# Altium PCB PCB1.PcbDoc
Units mm, origin at the board's own origin, x right, y up, seen from the top; angles counter-clockwise.
Board outline 30 x 30 mm, 2 copper layers (Top Layer, Bottom Layer); 40 components, 28 nets, 138 pads, 14 vias.
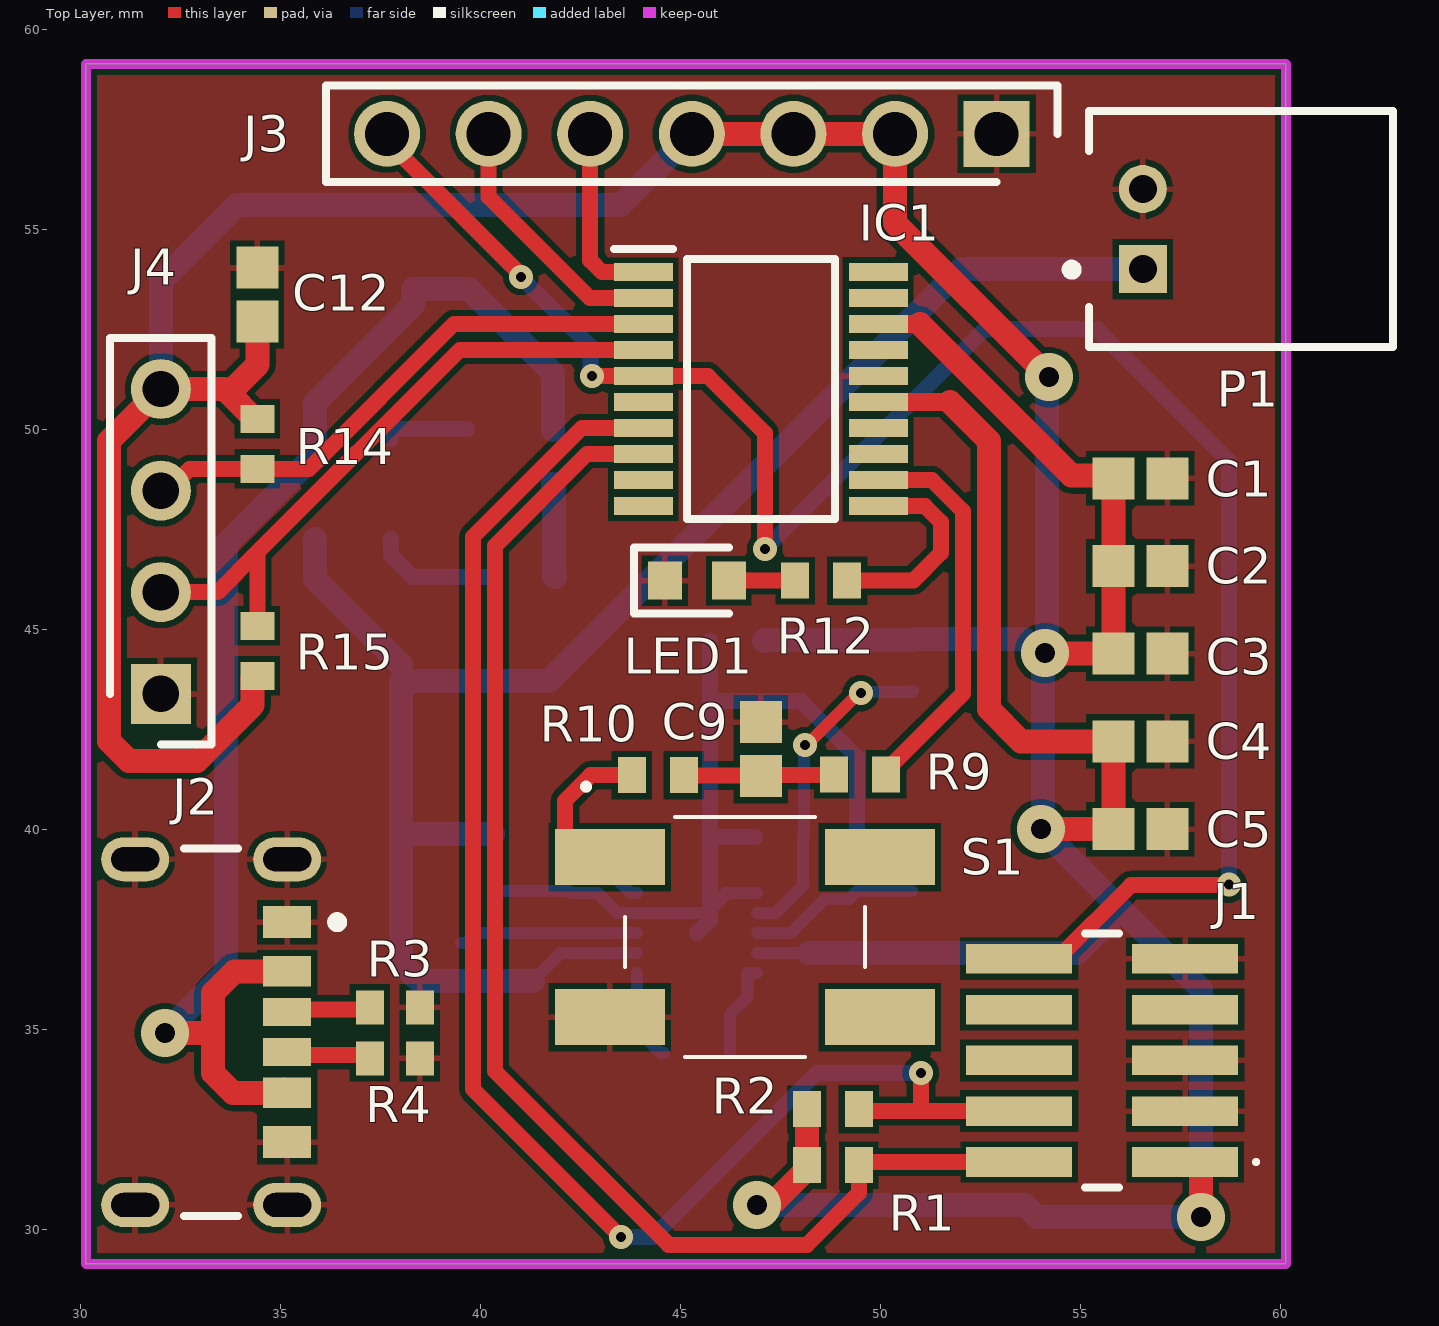
[diagram p0: Top Layer view]
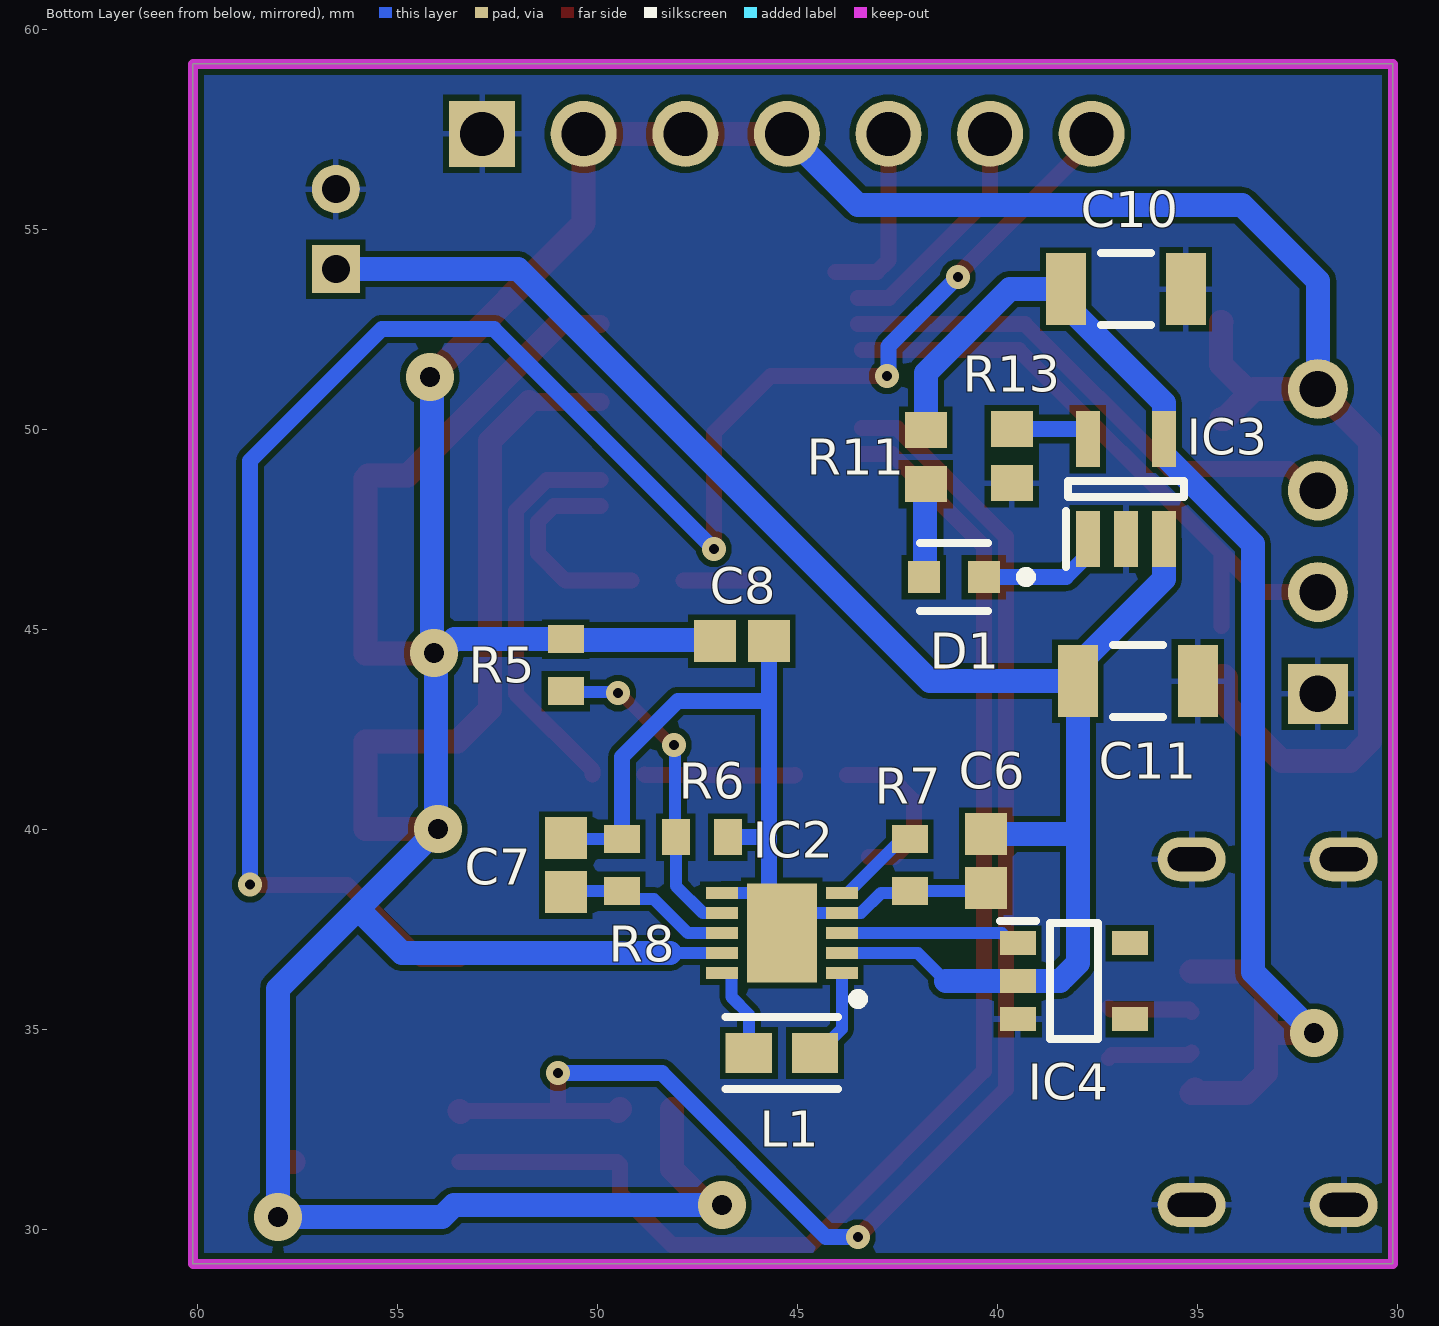
[diagram p1: Bottom Layer view, seen from below]
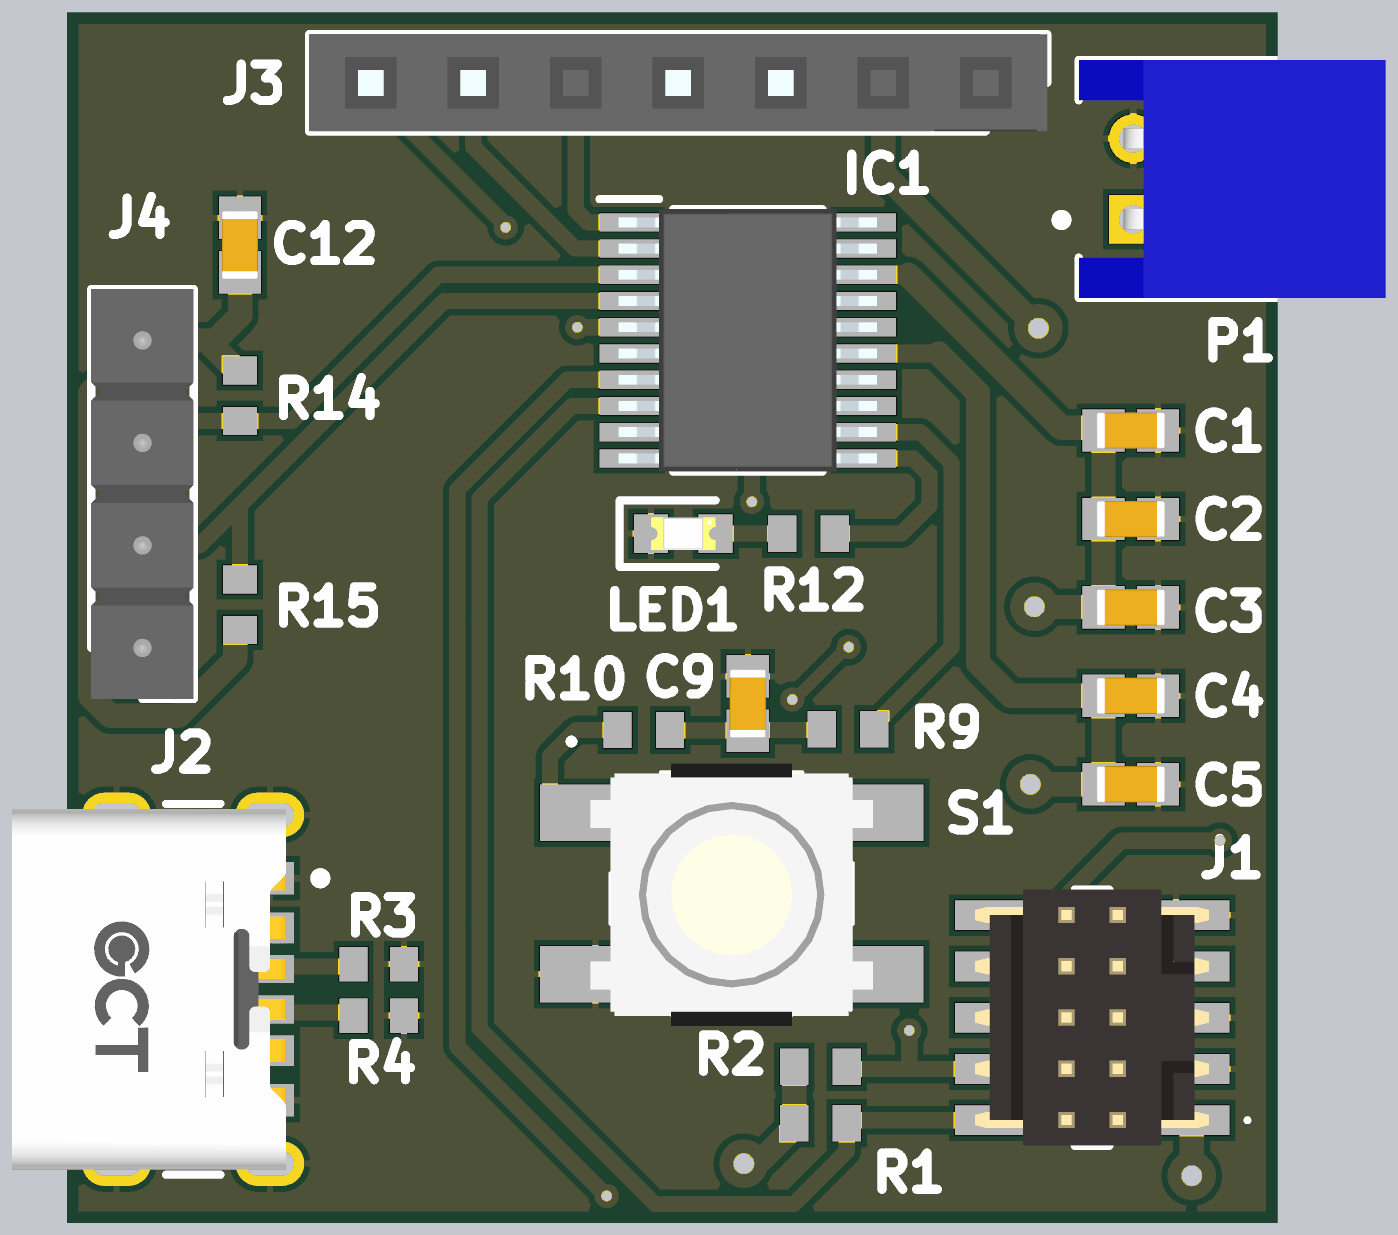
[diagram p2: 3D render of the assembled board from above, using the file's embedded part models]
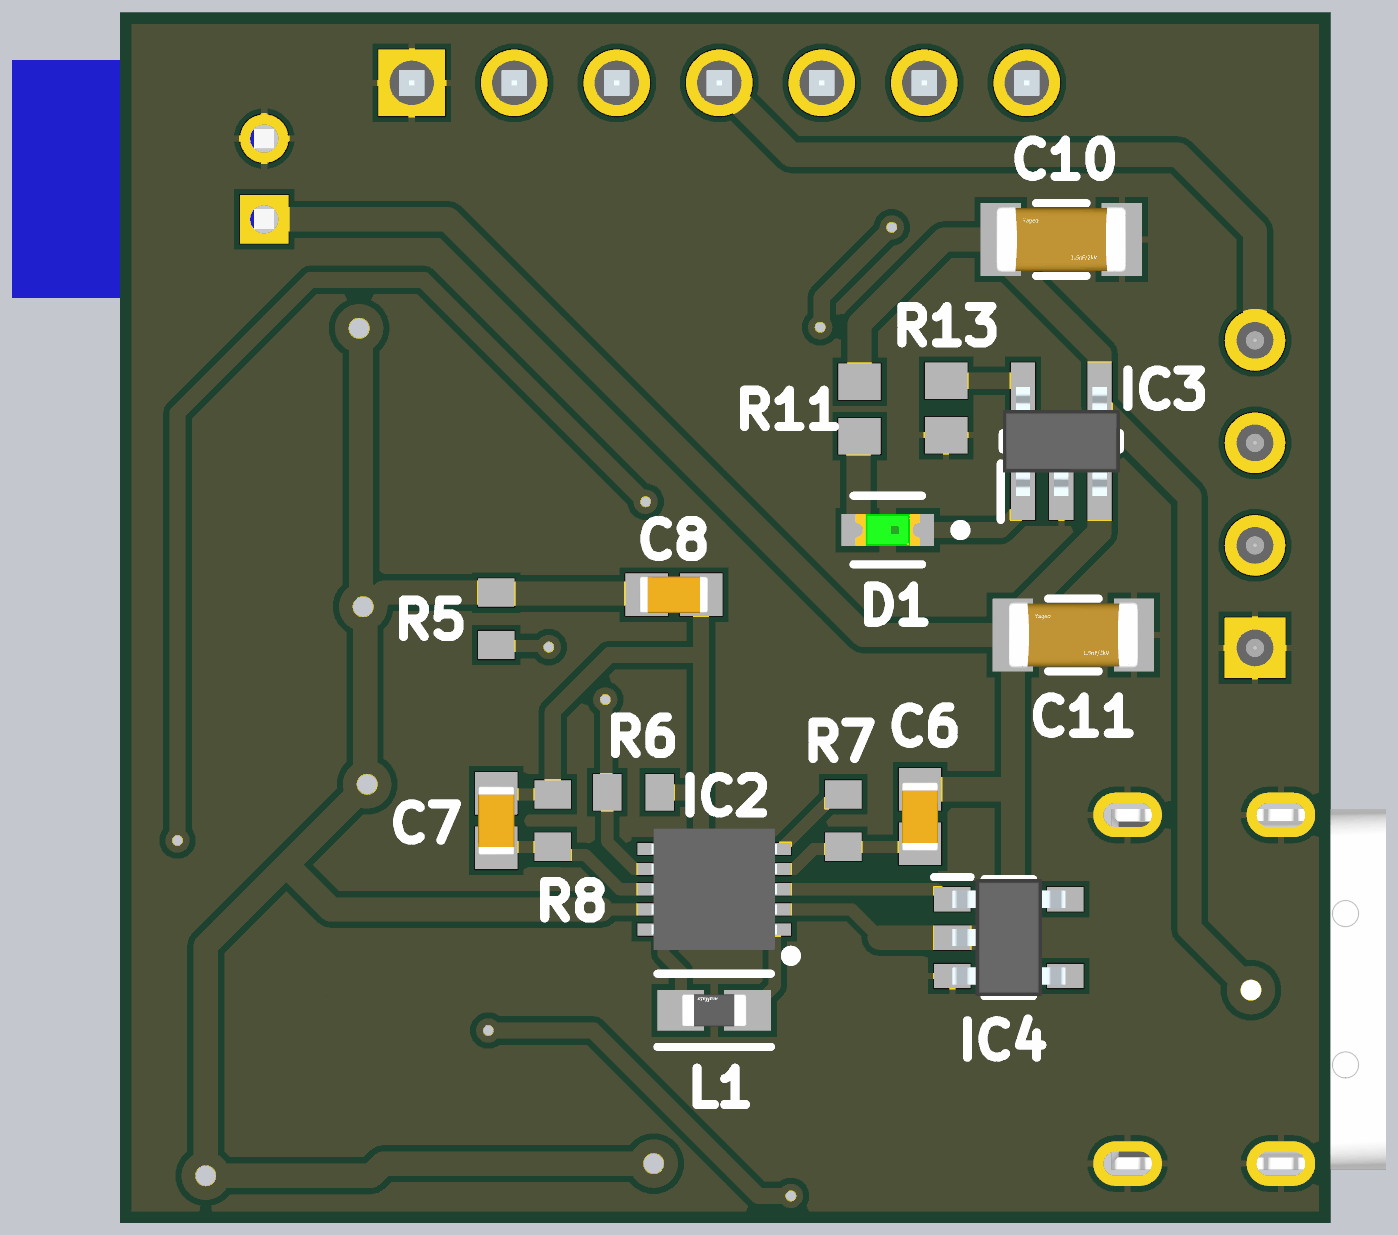
[diagram p3: 3D render of the assembled board from below, using the file's embedded part models]

## Layer stack, top to bottom
Top Solder: solder mask 0.0102, Solder Resist, Dk 3.5
Top Layer: signal copper 0.0356
Dielectric 1: dielectric 0.32, FR-4, Dk 4.8
Bottom Layer: signal copper 0.0356
Bottom Solder: solder mask 0.0102, Solder Resist, Dk 3.5

## Board outline
30.127,29.127 30.127,59.127 60.127,59.127 60.127,29.127

## Design rules (kind name [scope] priority, off if disabled: settings)
BoardOutlineClearance [All] p1: gap=0.2 ignorepadtopadclearanceinfootprint=FALSE
Clearance [All] p1: gap=0.15 ignorepadtopadclearanceinfootprint=FALSE
HoleSize [All] p1: absolutevalues=TRUE maxlimit=3.5 minlimit=0.25 maxpercent=80.000 minpercent=20.000
HoleToHoleClearance [All] p1: gap=0.25 allowstackedmicrovias=TRUE
MinimumAnnularRing [All] p1: minimumring=0.175
MinimumSolderMaskSliver [All] p1: minsoldermaskwidth=0.075
PolygonConnect [All] p1: connectstyle=Relief reliefconductorwidth=0.15 reliefentries=4 polygonreliefangle="90 Angle" airgapwidth=0.15
RoutingVias [All] p1: holewidth=0.25 width=0.6 viastyle="Through Hole" minholewidth=0.25 minwidth=0.6 maxholewidth=2 maxwidth=1.5
SilkToSilkClearance [All] p1: silktosilkclearance=0.3
SilkToSolderMaskClearance [IsPad] p1: minsilkscreentomaskgap=0.1 clearancetoexposedcopper=TRUE
SolderMaskExpansion [All] p1: expansion=0.03 istentingtop=FALSE
SupplyNets "Schematic Supply Nets_11" [InNet('VBAT')] p1: voltage=0.000
SupplyNets "Schematic Supply Nets_9" [InNet('VCC')] p2: voltage=0.000
SupplyNets "Schematic Supply Nets_8" [InNet('V3.3')] p3: voltage=0.000
SupplyNets "Schematic Supply Nets_6" [InNet('GND')] p4: voltage=0.000
UnRoutedNet [All] p1: checkbadconnections=TRUE
Width [All] p1: maxlimit=3 minlimit=0.15 preferedwidth=0.15
24 further rules are at their usual default settings.

## Components (designator, comment, footprint, x,y, rotation, side; value= is the part's Value field where it differs from the comment)
C1 "0.1uF" CAPC1608X90X40ML10T20 56.489,48.767 r180 top
C2 "0.1uF" CAPC1608X90X40ML10T20 56.489,46.575 r180 top
C3 "10uF" CAPC1608X90X40ML10T20 56.489,44.383 r180 top
C4 "0.1uF" CAPC1608X90X40ML10T20 56.489,42.192 r180 top
C5 "10uF" CAPC1608X90X40ML10T20 56.489,40 r180 top
C6 "10uF" CAPC1608X90X40ML10T20 40.3,39.2 r90 bottom
C7 "100pF" CAPC1608X90X40ML10T20 50.8,39.1 r270 bottom
C8 "10uF" CAPC1608X90X40ML10T20 46.4,44.7 r0 bottom
C9 "0.1uF" CAPC1608X90X40ML10T20 47,42 r270 top
C10 "4.7uF" FP-CC1206-1_25-MFG 36.8,53.5 r180 bottom value="4.7 uF"
C11 "4.7uF" FP-CC1206-1_25-MFG 36.5,43.7 r180 bottom value="4.7 uF"
C12 "0.1uF" CAPC1608X90X40ML10T20 34.415,53.362 r90 top
D1 "LTST-C190GKT" FP-LTST-C190GKT-MFG 41.1,46.3 r0 bottom
IC1 "LPC804M101JDH20J" SOP65P640X110-20N 47,51 r0 top
IC2 "LTC3127EDD#PBF" SON50P300X300X80-11N-D 45.4,37.4 r0 bottom
IC3 "MCP73831T-2ACI_OT" SOT95P270X145-5N 36.8,48.5 r90 bottom
IC4 "BD5330G-2MTR" SOT95P280X125-5N 38.1,36.2 r180 bottom
J1 "BD125-10-A-0305-0580-L-B" BD12510A03050580LB 55.53,34.216 r90 top
J2 "USB4125-GF-A-0190" FP-USB4125-GF-A-0190-MFG 32.157,34.921 r270 top
J3 "SSQ-107-01-T-S" RHDR7W64P254_1X7_1829X241X851P 52.895,57.381 r0 top
J4 "350-10-104-00-006000" HDRV4W46P0X254_1X4_1016X254X640P 32,43.38 r90 top
L1 "4.7uH" FP-LQM18FN_00-IPC_A 45.4,34.4 r0 bottom
LED1 "HSMR-C191-S0000" LEDC1608X70N 45.4,46.212 r0 top
P1 "S2B-PH-K-S(LF)(SN)" JST-S2B-PH-K-S_V 59,55 r90 top
R1 "100kO" RESC1608X55X30LL20T10 48.8,31.6 r180 top
R2 "100kO" RESC1608X55X30LL20T10 48.8,33 r180 top
R3 "5.1kΩ" RESC1608X55X30LL15T15 37.854,35.542 r0 top
R4 "5.1kΩ" RESC1608X55X30LL15T15 37.854,34.268 r0 top
R5 "330kO" RESC1608X55X30LL20T10 50.8,44.1 r90 bottom
R6 "180kO" RESC1608X55X30LL20T10 47.4,39.8 r0 bottom
R7 "33kO" RESC1608X55X30LL20T10 42.2,39.1 r90 bottom
R8 "510kO" RESC1608X55X30LL20T10 49.4,39.1 r270 bottom
R9 "1kO" RESC1608X55X30LL20T10 49.48,41.367 r0 top
R10 "0.1kO" RESC1608X55X30LL20T10 44.423,41.346 r0 top
R11 "470Ohm" RESC1609X50X30ML10T20 41.8,49.3 r90 bottom
R12 "1kO" RESC1608X55X30LL20T10 48.505,46.212 r0 top
R13 "2kOhm" RESC1609X50X30ML10T20 39.654,49.325 r90 bottom
R14 "10kΩ" RESC1608X55X30LL15T15 34.415,49.63 r90 top
R15 "10kΩ" RESC1608X55X30LL15T15 34.415,44.451 r270 top
S1 "B3SN-3012P" B3SN3012P 46.599,37.294 r180 top

## Footprints (in the part's own frame and the unit in brackets; to place one, negate y for a bottom-side part, rotate by r counter-clockwise, add the part's x,y. Pads: shape width x height; smd on the part's side, far side on the other; paste and mask are expansions set on the pad)
B3SN3012P [mm]
  rect 2.75x1.4 smd: 1(3.375,-2) 2(-3.375,-2) 3(3.375,2) 4(-3.375,2)
  silkscreen extent -3,-3.82 4.02,3, body extent -3.5,-3.22 3.5,3.28, height 3.1
BD12510A03050580LB [mm]
  rect 0.74x2.65 smd: 1(-2.54,-2.075) 2(-2.54,2.075) 3(-1.27,-2.075) 4(-1.27,2.075) 5(0,-2.075) 6(0,2.075) 7(1.27,-2.075) 8(1.27,2.075) 9(2.54,-2.075) 10(2.54,2.075)
  silkscreen extent -3.17,-3.9 3.18,0.43, body extent -3.17,-2.9 3.18,2.9, height 6.12
CAPC1608X90X40ML10T20 [mm] "Chip Capacitor, 2-Leads, Body 1.7x0.9mm, IPC Low Density"
  rect 1.05x1.05 smd: 1(-0.675,0) 2(0.675,0)
  body extent -0.85,-0.45 0.85,0.45, height 0.9
FP-CC1206-1_25-MFG [mm]
  rect 1x1.8 smd paste+0 mask+0: 1(-1.5,0) 2(1.5,0)
  silkscreen extent -0.62,-0.9 0.62,0.9, body extent -1.6,-0.8 1.6,0.8, height 1.45
FP-LQM18FN_00-IPC_A [mm]
  rect 1.158x1.012 smd paste+0 mask+0: 1(-0.827,0) 2(0.827,0)
  silkscreen extent -1.41,-0.91 1.41,0.91, body extent -0.8,-0.4 0.8,0.4, height 0.9
FP-LTST-C190GKT-MFG [mm]
  rect 0.8x0.8 smd paste+0 mask+0: 1(-0.75,0) 2(0.75,0)
  silkscreen extent -1.92,-0.85 0.85,0.85, body extent -0.8,-0.4 0.8,0.4, height 0.9
FP-USB4125-GF-A-0190-MFG [mm]
  rrect100% 1.1x1.7 hole 1.2 slot 0.6 at 0 deg paste-2539.97 mask+0: 1(-4.32,3) 2(4.32,3) 3(-4.32,-0.8) 4(4.32,-0.8)
  rect 0.7x1.2 smd paste+0 mask+0: A5(-0.5,3) B5(0.5,3)
  rect 0.76x1.2 smd paste+0 mask+0: A9(1.52,3) B9(-1.52,3)
  rect 0.8x1.2 smd paste+0 mask+0: A12(2.75,3) B12(-2.75,3)
  silkscreen extent -4.59,0.43 4.59,4.38, body extent -4.97,-3.57 4.97,3.95, height 0.25
HDRV4W46P0X254_1X4_1016X254X640P [mm]
  rect 1.5x1.5 hole 0.91: 1(0,0)
  round 1.5 hole 0.91: 2(2.54,0) 3(5.08,0) 4(7.62,0)
  silkscreen extent -1.27,-1.27 8.89,1.27, body extent -1.27,-1.27 8.89,1.27, height 6.4
JST-S2B-PH-K-S_V [mm] "THD, 2-Leads, Body 7.6x5.9mm, Pitch 2mm"
  rect 1.2x1.2 hole 0.7: 1(-1,2.45)
  round 1.2 hole 0.7: 2(1,2.45)
  silkscreen extent -2.95,-3.8 2.95,4.35, body extent -2.95,-3.8 2.95,3.8, height 4.8
LEDC1608X70N [mm]
  rect 0.85x0.95 smd: 1(-0.8,0) 2(0.8,0)
  silkscreen extent -1.57,-0.82 0.8,0.83, body extent -0.8,-0.4 0.8,0.4, height 0.6
RESC1608X55X30LL15T15 [mm] "Chip Resistor, 2-Leads, Body 1.60x0.80mm, IPC High Density"
  rect 0.7x0.85 smd: 1(-0.625,0) 2(0.625,0)
  body extent -0.87,-0.48 0.87,0.48, height 0.55
RESC1608X55X30LL20T10 [mm] "Chip Resistor, 2-Leads, Body 1.60x0.80mm, IPC High Density"
  rect 0.7x0.9 smd: 1(-0.65,0) 2(0.65,0)
  body extent -0.9,-0.5 0.9,0.5, height 0.55
RESC1609X50X30ML10T20 [mm] "Chip Resistor, 2-Leads, Body 1.55x0.85mm, IPC Low Density"
  rect 0.9x1.05 smd: 1(-0.675,0) 2(0.675,0)
  body extent -0.82,-0.48 0.82,0.48, height 0.5
RHDR7W64P254_1X7_1829X241X851P [mm]
  rect 1.65x1.65 hole 1.1: 1(0,0)
  round 1.65 hole 1.1: 2(-2.54,0) 3(-5.08,0) 4(-7.62,0) 5(-10.16,0) 6(-12.7,0) 7(-15.24,0)
  silkscreen extent -16.77,-1.2 1.53,1.21, body extent -16.77,-1.2 1.53,1.2, height 8.51
SON50P300X300X80-11N-D [mm]
  rect 0.8x0.3 smd: 1(-1.5,1) 2(-1.5,0.5) 3(-1.5,0) 4(-1.5,-0.5) 5(-1.5,-1) 6(1.5,-1) 7(1.5,-0.5) 8(1.5,0) 9(1.5,0.5) 10(1.5,1)
  rect 1.75x2.48 smd: 11(0,0)
  silkscreen extent -2.02,1.53 -1.77,1.77, body extent -1.55,-1.5 1.55,1.5, height 0.8
SOP65P640X110-20N [mm]
  rect 1.475x0.45 smd: 1(-2.938,2.925) 2(-2.938,2.275) 3(-2.938,1.625) 4(-2.938,0.975) 5(-2.938,0.325) 6(-2.938,-0.325) 7(-2.938,-0.975) 8(-2.938,-1.625) 9(-2.938,-2.275) 10(-2.938,-2.925) 11(2.938,-2.925) 12(2.938,-2.275) 13(2.938,-1.625) 14(2.938,-0.975) 15(2.938,-0.325) 16(2.938,0.325) 17(2.938,0.975) 18(2.938,1.625) 19(2.938,2.275) 20(2.938,2.925)
  silkscreen extent -3.68,-3.25 1.85,3.5, body extent -3.2,-3.25 3.2,3.25, height 1.1
SOT95P270X145-5N [mm]
  rect 1.4x0.6 smd: 1(-1.25,0.95) 2(-1.25,0) 3(-1.25,-0.95) 4(1.25,-0.95) 5(1.25,0.95)
  silkscreen extent -1.95,-1.45 0.2,1.5, body extent -1.35,-1.45 1.35,1.45, height 1.45
SOT95P280X125-5N [mm]
  rect 0.9x0.6 smd: 1(-1.4,0.95) 2(-1.4,0) 3(-1.4,-0.95) 4(1.4,-0.95) 5(1.4,0.95)
  silkscreen extent -1.85,-1.45 0.6,1.5, body extent -1.4,-1.45 1.4,1.45, height 1.25

## Part data
C1 C2 C3 C4 C5 C6 C8 C9 C12: library part CMP-2100-03594-1, "Chip Capacitor, 100 pF, +/- 5%, 50 V, -55 to 125 degC, 0603 (1608 Metric), RoHS, Tape and Reel", Capacitance=100pF, Case Code (Imperial)=0603, Case Code (Metric)=1608, Dielectric=C0G, Insulation Resistance=100GR, Manufacturer=Yageo, Max Operating Temperature=125degC, Min Operating Temperature=-55degC, Package Description="2-Pin Surface Mount Device, Body 1.6 x 0.8 mm", Package Quantity=1, Temperature Coefficient=30ppm/degC, Tolerance=5%, Voltage=50V, Case/Package=0603, Composition=Ceramic, Datasheet URL=http://www.yageo.com/documents/recent/UPY-GP_NP0_16V-to-50V_14.pdf, Datasheet Version="Rev. 14, 07/2016", Depth=0.8mm, Height=0.8mm, Lead Free=LeadFree, Length=1.6mm, Manufacturer URL=http://www.yageo.com/, Mount=SurfaceMount, Number of Pins=2, Package Reference=0603, Packaging=TapeandReel, Radiation Hardening=No, REACH SVHC=Unknown, RoHSCompliant=True, Termination=SMD/SMT, Thickness=0.035inch, Voltage Rating=50V, Voltage Rating (DC)=50V, Width=0.8mm
C7: library part CMP-2100-03594-1, "Chip Capacitor, 100 pF, +/- 5%, 50 V, -55 to 125 degC, 0603 (1608 Metric), RoHS, Tape and Reel", Case Code (Imperial)=0603, Case Code (Metric)=1608, Dielectric=C0G, Insulation Resistance=100GR, Manufacturer=Yageo, Max Operating Temperature=125degC, Min Operating Temperature=-55degC, Package Description="2-Pin Surface Mount Device, Body 1.6 x 0.8 mm", Package Quantity=1, Temperature Coefficient=30ppm/degC, Tolerance=5%, Voltage=50V, Capacitance=100pF, Case/Package=0603, Composition=Ceramic, Datasheet URL=http://www.yageo.com/documents/recent/UPY-GP_NP0_16V-to-50V_14.pdf, Datasheet Version="Rev. 14, 07/2016", Depth=0.8mm, Height=0.8mm, Lead Free=LeadFree, Length=1.6mm, Manufacturer URL=http://www.yageo.com/, Mount=SurfaceMount, Number of Pins=2, Package Reference=0603, Packaging=TapeandReel, Radiation Hardening=No, REACH SVHC=Unknown, RoHSCompliant=True, Termination=SMD/SMT, Thickness=0.035inch, Voltage Rating=50V, Voltage Rating (DC)=50V, Width=0.8mm
C10 C11: library part CMP-03422-000173-1, "CAP CER 4.7UF 50V X7R 1206", Capacitance="4.7 uF", Manufacturer=Yageo, Manufacturer Part Number=CC1206KKX7R9BB475, Package=CC1206-1.25, Temperature="-55°C to +125°C", Temperature Characteristic=X7R, Temperature Coefficient=15%, Temperature Range High=+125°C, Temperature Range Low=-55°C, Tolerance=0.1, Voltage Rating="50 V", Automotive=No, Automotive Grade=NA, Category=Cap, ComponentLink2Description=Datasheet, ComponentLink2URL=http://www.yageo.com/documents/recent/UPY-NP0X7R_HV_1KV-to-3KV_11.pdf, Device Class L1="Passive Components", Device Class L2=Capacitors, Device Class L3="Ceramic Capacitors", Digikey Description="CAP CER 4.7UF 50V X7R 1206", Footprint Url=http://www.yageo.com/exep/pages/download/literatures/UPY-C_GEN_24.pdf, Height=1.45mm, Lead Free=Yes, Material=Ceramic, Mouser Description="CC Series 1206 4.7 uF 50 V ±10% Tolerance X7R Multilayer Ceramic Capacitor", Octopart=https://octopart.com/cc1206kkx7r9bb475-yageo-50417574, RoHS=TRUE
D1: library part CMP-22017-000005-2, "LED GREEN CLEAR CHIP SMD", Case Code (Imperial)=0603, Case Code (Metric)=1608, Color=Green, Forward Current=30mA, Forward Voltage=2.1V, Lens Color=Colorless, Max Operating Temperature=85°C, Min Operating Temperature=-55°C, Package Quantity=1, Power Dissipation=100mW, Reverse Voltage=5V, Test Current=10mA, Voltage=2V, Case/Package=0603, Depth=0.8mm, Dominant Wavelength=569nm, Height=0.8mm, Illumination Color=Green, Lead Free="Lead Free", Length=1.6mm, Lens Style=Clear, Lens Transparency=Clear, Luminous Intensity=6mcd, Mount="Surface Mount", Number of Elements=1, Number of LEDs=1, Number of Pins=2, Packaging="Tape and Reel", Power Rating=100mW, Radiation Hardening=No, Viewing Angle=130°, Wavelength=565nm, Width=0.8mm
IC1: "Integrated Circuit", Manufacturer_Name=NXP, Mouser Part Number=771-LPC804M101JDH20J, Datasheet Link=https://www.nxp.com/docs/en/nxp/data-sheets/LPC804_DS.pdf, Height=1.1mm, Manufacturer_Part_Number=LPC804M101JDH20J, Mouser Price/Stock=https://www.mouser.co.uk/ProductDetail/NXP-Semiconductors/LPC804M101JDH20J?qs=W0yvOO0ixfFx8%2FU1a3Isyw%3D%3D
IC2: "Integrated Circuit", Manufacturer_Name="Analog Devices", Mouser Part Number=584-LTC3127EDD#PBF, Arrow Part Number=LTC3127EDD#PBF, Arrow Price/Stock=https://www.arrow.com/en/products/ltc3127eddpbf/analog-devices, Datasheet Link=https://www.analog.com/media/en/technical-documentation/data-sheets/3127fa.pdf, Height=0.8mm, Manufacturer_Part_Number=LTC3127EDD#PBF, Mouser Price/Stock=https://www.mouser.co.uk/ProductDetail/Analog-Devices/LTC3127EDDPBF?qs=hVkxg5c3xu8G1q1ZX405dA%3D%3D
IC3: "Integrated Circuit", Arrow Part Number=MCP73831T-2ACI/OT, Manufacturer_Name=Microchip, Mouser Part Number=579-MCP73831T-2ACIOT, Arrow Price/Stock=https://www.arrow.com/en/products/mcp73831t-2aciot/microchip-technology?utm_currency=USD&region=nac, Datasheet Link=http://ww1.microchip.com/downloads/en/DeviceDoc/20001984g.pdf, Height=1.45mm, Manufacturer_Part_Number=MCP73831T-2ACI/OT, Mouser Price/Stock=https://www.mouser.co.uk/ProductDetail/Microchip-Technology/MCP73831T-2ACI-OT?qs=yUQqVecv4qvbBQBGbHx0Mw%3D%3D
IC4: "Integrated Circuit", Manufacturer_Name="ROHM Semiconductor", Mouser Part Number=755-BD5330G-2MTR, Datasheet Link=https://fscdn.rohm.com/en/products/databook/datasheet/ic/power/voltage_detector/bd5xxxg-2m-e.pdf, Height=1.25mm, Manufacturer_Part_Number=BD5330G-2MTR, Mouser Price/Stock=https://www.mouser.co.uk/ProductDetail/ROHM-Semiconductor/BD5330G-2MTR?qs=YCa%2FAAYMW01zqS1e%252B79Sag%3D%3D
J1: "Connector", Manufacturer_Name="GCT (GLOBAL CONNECTOR TECHNOLOGY)", Mouser Part Number=640-BD12510A305580LB, Datasheet Link=https://gct.co/connector/bd125, Height=6.37mm, Manufacturer_Part_Number=BD125-10-A-0305-0580-L-B, Mouser Price/Stock=https://www.mouser.co.uk/ProductDetail/GCT/BD125-10-A-0305-0580-L-B?qs=amGC7iS6iy%252BPUE%252B5wV8wFA%3D%3D
J2: library part CMP-245163-000004-1, "CONN RCPT TYPE C 6P SMD RA"
J3: "Connector", Manufacturer_Name=SAMTEC, Mouser Part Number=200-SSQ10701TS, Datasheet Link=http://suddendocs.samtec.com/prints/ssq-1xx-xx-xxx-x-xx-xxx-xx-x-mkt.pdf, Height=8.51mm, Manufacturer_Part_Number=SSQ-107-01-T-S, Mouser Price/Stock=https://www.mouser.co.uk/ProductDetail/Samtec/SSQ-107-01-T-S?qs=rU5fayqh%252BE1xq4UrLxRC5Q%3D%3D
J4: "Connector", Manufacturer_Name=Mill-Max, Datasheet Link=https://www.mouser.com/datasheet/2/273/MMMCS22968_1-2552356.pdf, Height=6.401mm, Manufacturer_Part_Number=350-10-104-00-006000
L1: library part CMP-06042-016387-1, "FIXED IND 4.7UH 80MA 600 MOHM", Case Code (Imperial)=0603, Case Code (Metric)=1608, Current Rating=80mA, DC Resistance (DCR)=600mR, Max Operating Temperature=125°C, Min Operating Temperature=-55°C, Package Quantity=4000, Self Resonant Frequency=50MHz, Test Frequency=1MHz, Tolerance=20%, Case/Package=0603, Core Material=Ferrite, DC Current=80mA, Depth=0.9mm, Height=0.8mm, Height - Seated (Max)=0.035inch, Inductance=4.7uH, Lead Free="Lead Free", Length=1.6mm, Max DC Current=80mA, Military Standard=Not, Mount="Surface Mount", Packaging="Tape and Reel", Radiation Hardening=No, Rated Current-Max=80mA, RoHS Compliant=Yes, Saturation Current=80mA, Series=LQM18F, Shielding=Shielded, Termination=SMD/SMT, Weight=7.1E-05oz, Width=0.031inch
LED1: "LED", Manufacturer_Name="Avago Technologies", Mouser Part Number=630-HSMR-C191-S0000, Datasheet Link=https://docs.broadcom.com/docs/HSMR-C191-S0000-DS100, Height=0.7mm, Manufacturer_Part_Number=HSMR-C191-S0000, Mouser Price/Stock=https://www.mouser.co.uk/ProductDetail/Broadcom-Avago/HSMR-C191-S0000?qs=tMOYG%252Bw4%252BLxppTo9IXYduQ%3D%3D
P1: library part CMP-1755-00004-1, "Male Header, Pitch 2 mm, 1 x 2 Position, Height 4.8 mm, Tail Length 3.4 mm, -25 to 85 degC, RoHS, Bulk", Capacitance="10 uF", Case\Package=Radial, Max Operating Temperature="85 degC", Min Operating Temperature="-40 degC", Package Quantity=200, Tolerance=20%, Voltage Rating="50 V", ComponentLink1Description=Datasheet, ComponentLink1URL=http://www.jst-mfg.com/product/pdf/eng/ePH.pdf, DatasheetVersion=Dec-12, Diameter="5 mm", Height="11 mm", Lead Pitch="2 mm", Length="11 mm", Mount="Through Hole", PackageDescription="Male Header, Pitch 2 mm, 1 x 2 Position, Height 4.8 mm, Tail Length 3.4 mm", PackageReference=S2B-PH-K-S, Packaging=Bulk, Pins=2, Radiation Hardening=No, REACH SVHC="No SVHC", RoHSCompliant=true, Voltage Rating (DC)="50 V"
R1 R2 R5 R6 R7 R8 R9 R10 R12: library part CMP-2000-01250-1, Manufacturer="KOA Speer", Part Number=RK73H1JTTD1823F
R3 R4 R14 R15: library part CMP-2000-00803-1, Manufacturer=Panasonic, Part Number=ERJ-3GEYJ512V
R11 R13: library part CMP-2000-03159-1, Manufacturer="Vishay Dale", Part Number=CRCW06032K00FKEA
S1: "Switch", Manufacturer_Name="Omron Electronics", Mouser Part Number=653-B3SN-3012P, Arrow Part Number=B3SN-3012P, Arrow Price/Stock=https://www.arrow.com/en/products/b3sn3012p/omron?region=nac, Datasheet Link=https://componentsearchengine.com/Datasheets/2/B3SN-3012P.pdf, Height=3.4mm, Manufacturer_Part_Number=B3SN-3012P, Mouser Price/Stock=https://www.mouser.co.uk/ProductDetail/Omron-Electronics/B3SN-3012P?qs=nNiD76Ca0%252BuGaCx%252BnRL5KQ%3D%3D

## Via types
v1: diameter 0.6, hole 0.25, Top Layer to Bottom Layer, tented both sides, 8 vias
v2: diameter 1.2, hole 0.5, Top Layer to Bottom Layer, tented both sides, 6 vias

## Nets (pads, with @x,y where several pads share a name; then routed paths per layer and width w, separated by ;. In a path a pad name is that pad's centre, name@x,y a point inside that pad or via, vN(x,y) a via of type N, cw(c..) or ccw(c..) an arc to the next point about the centre after c; other vN are vias at no path point)
EN: IC2.3 IC4.1 | length 4.5
  Bottom Layer w0.3: IC4.1 39.65,37.15 39.9,37.4 IC2.3
GND: C1.1 C2.1 C3.1 C4.1 C5.1 C9.1 C10.2 C11.2 C12.2 IC1.16 IC3.2 IC4.3 J1.3 J1.5 J1.9 J2.1 J2.2 J2.3 J2.4 J2.A12 J2.B12 J3.1 J4.1 LED1.1 P1.2 R3.2 R4.2 R13.1 S1.3
GPIO_BTN: IC1.12 R9.2 | length 9.8
  Top Layer w0.4: IC1.12 51.275,48.725 52.05,47.95 52.05,43.387 50.13,41.467 R9.2
GPIO_LED: IC1.11 R12.2 | length 5.1
  Top Layer w0.4: R12.2 50.812,46.212 51.5,46.9 51.5,47.675 51.1,48.075 IC1.11
I2C0_SCL: IC1.1 J3.5 | length 4.6
  Top Layer w0.4: J3.5 42.735,54.218 43.028,53.925 IC1.1
I2C0_SDA: IC1.2 J3.6 | length 5.9
  Top Layer w0.381: 40.195,55.805 40.2,55.8
  Top Layer w0.4: 40.195,55.805 J3.6 ; 40.2,55.8 42.725,53.275 IC1.2@43.5,53.275
I2C1_SCL: IC1.3 J4.3 R14.1 | length 13.2
  Top Layer w0.4: J4.3 32.176,48.46 32.72,49.005 R14.1 35.705,49.005 39.325,52.625 IC1.3@43.5,52.625
I2C1_SDA: IC1.4 J4.2 R15.1 | length 15.7
  Top Layer w0.4: J4.2 33.42,45.92 34.415,46.915 ; R15.1 34.415,46.915 ; IC1.4@43.4,51.975 39.475,51.975 34.415,46.915
NetC6_1: C6.1 C7.1 C8.1 IC2.4 IC2.6 IC2.11 R6.1 R7.1 R8.1 | length 23.9
  Bottom Layer w0.3: C6.1 40.375,38.45 R7.1 42.249,38.401 42.924,38.401 43.426,37.9 45.675,37.9 45.725,37.95 IC2.11@46.15,38.375 ; IC2.11@45.725,38 46.125,38.4 IC2.6 ; R8.1 C7.1@50.775,39.75
  Bottom Layer w0.4: IC2.11 45.725,37.725 45.725,37.95 45.725,38 45.725,39.9 ; C8.1 45.725,43.2 ; R6.1@46.85,39.8 R6.1 45.825,39.8 45.725,39.9 ; R8.1 49.4,41.8 48,43.2 45.725,43.2 ; 45.725,39.9 45.725,43.2
NetC7_2: C7.2 IC2.8 R8.2 | length 4.3
  Bottom Layer w0.3: IC2.8 47.75,37.4 48.6,38.25 49.2,38.25 R8.2 C7.2@50.775,38.45
NetC9_2: C9.2 R9.1 R10.2 | length 3.8
  Top Layer w0.4: R10.2 45.084,41.336 46.989,41.336 C9.2 47.021,41.346 48.809,41.346 R9.1
NetD1_1: D1.1 IC3.1 | length 3.2
  Bottom Layer w0.4: IC3.1 37.75,46.85 38.3,46.3 D1.1
NetD1_2: D1.2 R11.1 | length 2.3
  Bottom Layer w0.6: R11.1 41.825,48.6 41.825,46.325 D1.2
NetIC2_1: IC2.1 L1.1 | length 2.3
  Bottom Layer w0.3: IC2.1 43.9,35 44.5,34.4 L1.1
NetIC2_5: IC2.5 R7.2 | length 2.3
  Bottom Layer w0.3: R7.2@42.35,39.6 42.55,39.6 43.75,38.4 IC2.5
  Bottom Layer w0.4: R7.2 R7.2@42.35,39.6
NetIC2_7: IC2.7 R5.1 R6.2 | length 8.2
  Top Layer w0.3: v1(48.1,42.1) 48.15,42.1 49.45,43.4 v1(49.5,43.4)
  Bottom Layer w0.3: IC2.7 47.374,37.9 48.05,38.576 R6.2 48.075,39.825 48.075,42.075 v1(48.1,42.1) ; v1(49.5,43.4) 49.525,43.425 50.775,43.425 R5.1
NetIC2_10: IC2.10 L1.2 | length 2.4
  Bottom Layer w0.3: L1.2 46.227,35.367 46.66,35.8 46.66,36.4 IC2.10
NetIC3_5: IC3.5 R13.2 | length 2.1
  Bottom Layer w0.4: IC3.5 37.75,49.9 37.85,50 R13.2
NetJ2_A5: J2.A5 R3.1 | length 2.1
  Top Layer w0.381: J2.A5 J2.A5@35.218,35.482 ; R3.1@37.169,35.482 R3.1
  Top Layer w0.4: J2.A5@35.218,35.482 R3.1@37.169,35.482
NetJ2_B5: J2.B5 R4.1 | length 2.1
  Top Layer w0.381: J2.B5 J2.B5@35.234,34.345 ; R4.1@37.152,34.345 R4.1
  Top Layer w0.4: J2.B5@35.234,34.345 R4.1@37.152,34.345
NetLED1_2: LED1.2 R12.1 | length 1.7
  Top Layer w0.4: LED1.2 R12.1
NetR10_1: R10.1 S1.1 | length 4.2
  Top Layer w0.4: S1.1 42.6,39.294 42.1,39.794 42.1,40.7 42.746,41.346 R10.1
RESETN: IC1.5 J1.10 J3.7 | length 47.7
  Top Layer w0.4: J3.7 37.655,57.199 41,53.854 v1(41,53.8) ; v1(42.775,51.325) IC1.5@44.012,51.325 ; IC1.5 45.675,51.325 47.1,49.9 v1@47.1,47.092 ; J1.10 54.41,36.756 56.255,38.6 v1@58.7,38.6
  Bottom Layer w0.4: v1(41,53.8) 42.737,52.063 42.737,51.363 v1(42.775,51.325) ; v1(47.1,47) 52.6,52.5 55.4,52.5 58.7,49.2 v1(58.7,38.608)
SWCLK: IC1.7 J1.4 R2.1 | length 38
  Top Layer w0.4: IC1.7@43.4,50.025 42.525,50.025 39.8,47.3 39.8,33.5 v1(43.5,29.8) ; R2.1@49.5,32.946 51,32.946 ; v1(51,33.9) 51,32.946 ; J1.4 51,32.946
  Top Layer w0.6: R2.1 49.45,32.996 R2.1@49.5,32.946 ; J1.4@53.432,32.923 J1.4
  Bottom Layer w0.4: v1(43.5,29.8) 44.3,29.8 48.4,33.9 v1(51,33.9)
SWDIO: IC1.8 J1.2 R1.1 | length 33.3
  Top Layer w0.4: IC1.8@43.4,49.375 42.653,49.375 40.35,47.072 40.35,33.95 44.696,29.604 48.154,29.604 49.45,30.9 R1.1 49.526,31.676 J1.2
V3.3: C1.2 C2.2 C3.2 C4.2 C5.2 C8.2 C12.1 IC1.15 IC1.18 IC2.9 J1.1 J3.2 J3.3 J3.4 J4.4 R1.2 R2.2 R5.2 R14.2 R15.2 | length 135.5
  Top Layer w0.45: IC1.15 51.725,50.675 ; IC1.18 50.975,52.625
  Top Layer w0.6: R15.2 34.346,43.826 34.296,43.776 34.296,43.096 32.9,41.7 31.2,41.7 30.704,42.196 30.704,49.704 J4.4 33.594,51 33.701,50.893 ; R14.2 34.34,50.255 33.701,50.893 ; C12.1@34.415,52.678 34.421,52.671 34.421,51.613 33.701,50.893 ; J3.4 J3.3 J3.2 50.355,55.145 v2(54.2,51.3) ; v2@47.365,30.715 48.15,31.5 R1.2 R2.2 ; 50.975,52.625 54.762,48.838 55.743,48.838 C1.2 C2.2 C3.2 55.806,44.392 54.108,44.392 v2(54.1,44.4) ; 51.725,50.675 52.7,49.7 52.7,43 53.508,42.192 C4.2 C5.2 v2(54,40) ; J1.1 57.93,31.676 58,31.606 v2(58,30.3)
  Bottom Layer w0.3: IC2.9 48.2,36.9
  Bottom Layer w0.6: J4.4 32,53.7 33.9,55.6 43.494,55.6 J3.4 ; v2(46.9,30.6) 53.6,30.6 53.9,30.3 v2(58,30.3) 58,36 56,38 ; C8.2 47.1,44.725 50.775,44.725 R5.2 53.588,44.75 53.938,44.4 v2(54.1,44.4) ; 48.2,36.9 54.9,36.9 56,38 ; v2(54.2,51.3) 54.15,51.25 54.15,44.45 v2(54.1,44.4) ; v2(54.1,44.4) 54.05,44.35 54.05,40.05 v2(54,40) 56,38
VBAT: C6.2 C11.1 IC2.2 IC3.3 IC4.2 P1.1 | length 43
  Bottom Layer w0.3: 41.3,36.2 42,36.9 IC2.2
  Bottom Layer w0.4: 38,39.9 38.025,39.875 ; C11.1 C11.1@38,44.1 ; 38.351,36.3 38.451,36.2
  Bottom Layer w0.6: IC3.3 35.85,46.25 C11.1@38,44.1 ; 38.025,39.875 C6.2 ; 38.351,36.3 38,36.651 38,39.9 C11.1 41.7,43.7 52,54 P1.1 ; 38.451,36.2 IC4.2 41.3,36.2
VCC: C10.1 IC3.4 J2.A9 J2.B9 R11.2 | length 34.4
  Top Layer w0.6: v2(32.1,34.9) 33.3,34.9 ; 33.8,33.4 33.3,33.9 33.3,34.9 ; 33.801,33.401 J2.A9 J2.A9@35.077,33.481 ; J2.B9 33.841,36.441 33.3,35.9 33.3,34.9
  Bottom Layer w0.6: v2(32.1,34.9) 33.625,36.425 33.625,47.125 35.85,49.35 IC3.4 35.85,50.65 38.3,53.1 C10.1 39.7,53.5 41.8,51.4 R11.2
pads on no net: IC1.6 IC1.9 IC1.10 IC1.13 IC1.14 IC1.17 IC1.19 IC1.20 IC4.4 IC4.5 J1.6 J1.7 J1.8 S1.2 S1.4

## Polygon pours and split planes (outlines as drawn)
GND on Top Layer "NONET_L-01_P-001" (solid, pour order 0): 30.125,59.125 60.125,59.125 60.125,29.125 30.125,29.125
GND on Bottom Layer "NONET_L-01_P-001" (solid, pour order 1): 30.25,59 60,59 60,29.25 30.25,29.25 30.252,29.252 30.252,59.001

## Keep-outs
Keep-Out Layer:
  the board outline again, w0.254